# Altium PCB fligt_control_card.PcbDoc (part 3 of 3)
Units mil, origin at the board's own origin, x right, y up, seen from the top; angles counter-clockwise.
Board outline 2510.03 x 2930.03 mil, 4 copper layers (Top Layer, LY_1, LY_2, Bottom Layer), stack 62.677 mil thick; 107 components, 79 nets, 361 pads, 454 vias.
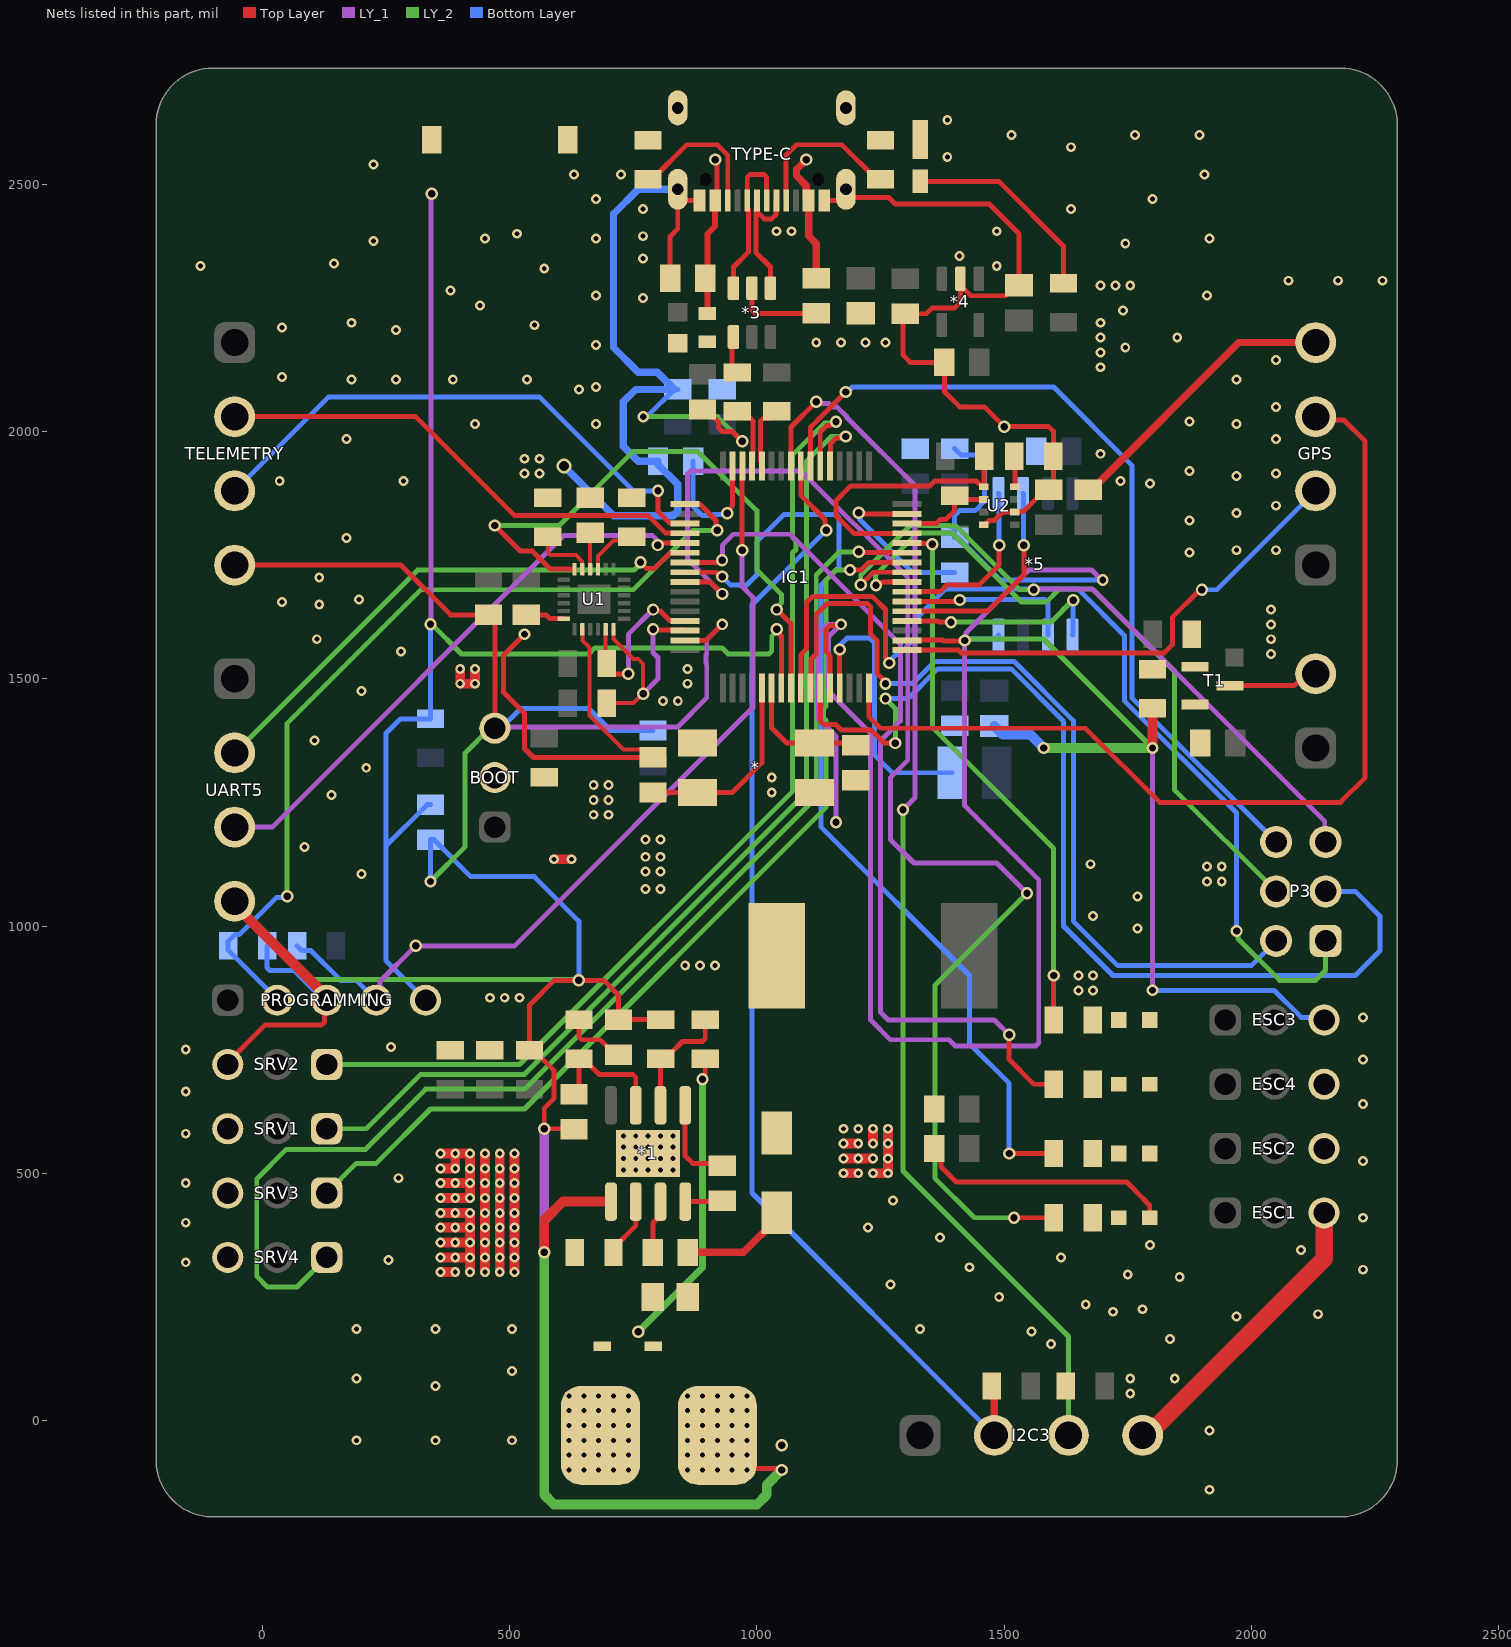
[diagram p4: the nets of this part, all layers, seen from the top]

## Via types
v1: diameter 20, hole 10, Top Layer to Bottom Layer, tented both sides, 351 vias
v2: diameter 25, hole 15, Top Layer to Bottom Layer, tented both sides, 89 vias
v3: diameter 23.62, hole 13.78, Top Layer to Bottom Layer, tented both sides, 8 vias
v4: diameter 35, hole 25, Top Layer to Bottom Layer, tented both sides, 4 vias
v5: diameter 25, hole 15, Top Layer to LY_2, tented both sides, 1 vias
v6: diameter 30, hole 20, Top Layer to Bottom Layer, tented both sides, 1 vias

## Nets (pads, with @x,y where several pads share a name; then routed paths per layer and width w, separated by ;. In a path a pad name is that pad's centre, name@x,y a point inside that pad or via, vN(x,y) a via of type N, cw(c..) or ccw(c..) an arc to the next point about the centre after c; other vN are vias at no path point) (continued)
GND: "PWR LED.1" "VIN(5V-24V) ->.2" *1.5 *1.9 *3.2 *4.2 *5.4 *.2 *.4 BOOT.3 C2.2 C3.2 C4.1 C5.1 C6.1 C7.2 C8.1 C9.1 C10.2 C11.1 C12.1 C13.1 C14.1 C15.1 C16.1 C17.1 C18.1 C19.1 C20.1 C21.1 C22.1 C23.1 C24.1 C25.1 C26.1 C27.1 C28.1 C29.1 C30.1 C31.1 C32.1 C33.1 D1.2 D3.1 D5.2 D6.1 D8.1 ESC1.3 ESC2.3 ESC3.3 ESC4.3 GPS.4 I2C3.4 IC1.12 IC1.18 IC1.63 PROGRAMMING.3 R1.1 R5.1 R6.1 R8.1 R9.1 R15.1 R17.1 R23.1 R26.1 R29.1 RESET.2 SRV1.3 SRV2.3 SRV3.3 SRV4.3 T1.2 TELEMETRY.4 TYPE-C.A1/B12 TYPE-C.A12/B1 TYPE-C.Shell U1.18 U1.20 U2.1 U2.7 UART5.4 | length 20885.8
  Top Layer w8: U1.20@647.01,1600 647.01,1577.13 661.15,1562.99 661.15,1425.53 730.15,1356.54 774.33,1356.54 C25.1@790,1340.87
  Top Layer w10: SRV2.3@-70,720 -70,724.14 5.86,800 120,800 125.86,805.86 125.86,845.86 PROGRAMMING.3@130,850 PROGRAMMING.3@130,856.93 ; UART5.4@-56.14,1043.07 UART5.4@-56.14,1050 ; TELEMETRY.4@-56.14,1730 280,1730 380.67,1629.33 C29.1@457.01,1629.33 470,1616.34 BOOT.3@470,1400 ; v3(530,1590) 487.5,1547.5 487.5,1472.5 530,1430 530,1358.97 548.1,1340.87 C25.1@790,1340.87 ; C30.1@533.38,1629.33 573.58,1629.33 581.45,1621.46 U1.18@609.8,1621.46 ; C6.1@630,589.13 629.13,590 v2(570,590) 570,631.84 590,651.84 590,707.6 548.86,748.74 R1.1@540,748.74 540,840 590,890 690,890 720,860 C9.1@720,810.63 R8.1@805.59,810.63 ; C2.2@824.57,2310 824.57,2363.14 824.14,2363.56 824.14,2394.14 839.92,2409.92 TYPE-C.Shell@839.92,2481.01 ; TYPE-C.Shell@839.92,2489.88 TYPE-C.Shell@839.92,2481.01 ; IC1.63@854.49,1577.64 897.64,1577.64 v3(930,1610) ; TYPE-C.A12/B1@884.01,2467.44 853.49,2467.44 TYPE-C.Shell@839.92,2481.01 ; C10.2@890,2044.57 896.89,2044.57 922.44,2019.02 922.44,2007.56 930,2000 950,2000 v2(970,1980) ; 920,-30 987.39,-97.39 1047.39,-97.39 v2(1050,-100) ; *3.2@990,2280 990,2244.99 995.86,2239.13 C3.2@1120,2239.13 ; D1.2@1040,407.2 D1.2@1040,420 ; TYPE-C.A1/B12@1135.98,2467.44 TYPE-C.Shell@1166.51,2467.44 ; IC1.12@1147.79,1481.18 1147.79,1546.87 1140,1554.66 1140,1600 1147.39,1607.39 1167.39,1607.39 v3(1170,1610) ; TYPE-C.Shell@1180.08,2489.88 1180.08,2486.8 1193.64,2473.23 1266.77,2473.23 1280,2460 1470,2460 1530,2400 C12.1@1530,2295.43 1524.09,2295.43 1503.27,2274.61 1432.32,2274.61 *4.2@1411.49,2295.43 ; IC1.18@1303.31,1577.64 1304.21,1578.54 1375.11,1578.54 1376.97,1576.69 1419.25,1576.69 v2(1420,1577.44) ; C5.1@1358.9,550 1372.36,536.54 1372.36,513.5 1403.46,482.4 1747.6,482.4 1783.46,446.54 1783.46,445.86 1794.45,434.87 D8.1@1794.45,410 ; *4.2@1411.49,2309.02 *4.2@1411.49,2295.43 ; U2.1@1458.5,1811.61 1460.39,1813.5 1463.34,1813.5 1469.84,1820 1480,1820 1497.2,1837.2 U2.7@1521.49,1837.2 1522.3,1838.01 1538.64,1838.01 1583.11,1882.48 C32.1@1590,1882.48 1599.37,1891.85 R26.1@1599.37,1950 1599.37,2000.63 1590,2010 v2(1500,2010) 1460,2050 1410,2050 1379.13,2080.87 C11.1@1379.13,2140 1310,2140 1295.67,2154.33 1295.67,2238.15 1342.56,2238.15 1354.41,2250 1360.59,2250 1360.71,2250.12 1400.12,2250.12 1411.49,2261.5 *4.2@1411.49,2295.43
  Top Layer w15: C7.2@860,340 972.79,340 D1.2@1040,407.2 ; C31.1@1670,1882.48 1676.89,1882.48 1974.41,2180 GPS.4@2130,2180
  Top Layer w20: UART5.4@-56.14,1043.07 PROGRAMMING.3@130,856.93 ; v1(360,300) v1(390,300) ; v1(360,330) v1(390,330) v1(420,330) ; v1(360,360) v1(390,360) v1(420,360) ; v1(360,390) v1(390,390) v1(420,390) ; v1(360,420) v1(390,420) v1(420,420) v1(420,390) ; v1(360,450) v1(390,450) v1(420,450) v1(420,480) ; v1(360,480) v1(390,480) v1(420,480) ; v1(360,510) v1(390,510) v1(390,540) ; v1(360,540) v1(390,540) ; v1(400,1520) v1(400,1490) v1(430,1490) v1(430,1520) ; v1(420,300) v1(420,330) ; v1(450,300) v1(450,330) v1(450,360) v1(450,390) v1(450,420) v1(450,450) v1(450,480) v1(450,510) v1(450,540) ; v1(480,300) v1(480,330) v1(480,360) v1(480,390) v1(480,420) v1(480,450) v1(480,480) v1(480,510) v1(480,540) ; v1(510,300) v1(510,330) v1(510,360) v1(510,390) v1(510,420) v1(510,450) v1(510,480) v1(510,510) v1(510,540) ; v2(570,340) 570,405 607.56,442.56 *1.5@705,442.56 ; v1(590,1135) v1(625,1135) ; v1(1175,500) v1(1205,500) ; v1(1175,530) v1(1205,530) v1(1235,530) ; v1(1175,560) v1(1205,560) ; v1(1235,500) v1(1265,500) v1(1265,530) v1(1265,560) v1(1265,590) ; v1(1235,560) v1(1235,590) ; v2(1800,1360) R15.1@1800,1440.63 ; v1(390,540) v1(420,540) v1(420,510) v1(420,480) ; v1(420,330) v1(420,360) ; v1(420,360) v1(420,390)
  Top Layer w35: I2C3.4@1780,-30 1790,-30 2147.05,327.05 ESC1.3@2147.05,420
  LY_1 w10: BOOT.3@470,1400 472.5,1402.5 839.67,1402.5 898.59,1461.41 898.59,1529.59 897.5,1530.68 897.5,1549.32 898.59,1550.41 898.59,1578.59 v3(930,1610) ; v2(1160,1210) 1160,1383.62 1123.19,1420.43 1123.19,1590 1143.19,1610 v3(1170,1610) 1144.84,1584.85 1144.84,1474.53 1230,1389.38 1230,810 1270,770 1388.41,770 1400.91,757.5 1564.14,757.5 1570,763.36 1570,1093.37 1420,1243.37 v2(1420,1577.44) 1422.87,1580.31 1422.87,1592.87 1550,1720 1676.91,1720 1697.33,1699.58 v3(1699.58,1699.58) ; v3(1800,870) v2(1800,1360)
  LY_1 w20: v2(570,340) v2(570,590)
  LY_2 w10: UART5.4@-56.14,1050 102.36,891.5 638.5,891.5 v2(640,890) ; v2(340,1090) 410,1160 410,1350 460,1400 BOOT.3@470,1400 ; v3(770,2030) 920,2030 v2(970,1980) ; v2(1420,1577.44) 1422.87,1580.31 1433.21,1580.31 1433.36,1580.45 1579.55,1580.45 v2(1800,1360)
  LY_2 w20: v2(570,340) 570,-150 590,-170 1000,-170 1020,-150 1020,-130.1 1050,-100.1 v2(1050,-100) ; v1(730,506.55) v1(755,506.55) ; v1(730,529.91) v1(755,529.91) ; v1(730,552.83) v1(730,575) ; v1(755,552.83) v1(755,575) ; v1(780,506.55) v1(780,529.91) ; v1(780,552.83) v1(780,575) ; v1(805,552.83) v1(805,575) ; v2(1580,1360) v2(1800,1360)
  Bottom Layer w10: R17.1@9.37,960 9.37,915.86 15.23,910 64.24,910 124.24,850 PROGRAMMING.3@130,850 ; v2(340,1090) C23.1@340,1174.57 346.89,1174.57 421.45,1100 550,1100 640,1010 v2(640,890) ; BOOT.3@470,1400 482.35,1400 522.35,1440 660,1440 704.57,1395.43 C17.1@790,1395.43 ; v3(770,2030) 772.6,2032.61 780.28,2032.61 832.68,2085 833.11,2085.43 C21.1@840,2085.43 ; C19.1@1400,1965.43 1413.17,1952.26 1447.73,1952.26 1460,1940 1460,1858.79 1441.21,1840 1410,1840 1400,1830 C27.1@1400,1785.43 1406.89,1785.43 1492.32,1700 1699.15,1700 v3(1699.58,1699.58) ; v2(1420,1577.44) 1422.56,1580 1481.34,1580 1488.34,1587.01 *5.4@1488.34,1588.39 ; v3(1800,870) 2045.73,870 2100.55,815.18 2141.87,815.18 ESC3.3@2147.05,810
  Bottom Layer w15: v6(610,1930) 710,1830 831.21,1830 840,1838.79 840,1893.11 800,1933.11 C26.1@800,1940 760,1940 730,1970 730,2060 755,2085 C21.1@832.68,2085 ; C21.1@833.11,2085.43 798.54,2120 760,2120 710,2170 710,2440 759.88,2489.88 TYPE-C.Shell@839.92,2489.88
  Bottom Layer w20: v1(805,506.55) v1(830,506.55) ; v1(805,529.91) v1(830,529.91) ; v1(830,552.83) v1(830,575) ; C22.1@1480,1404.57 1497.64,1386.93 1553.07,1386.93 v2(1580,1360)
  other v1: 1915,-140 860,-100 890,-100 920,-100 950,-100 980,-100 860,-70 890,-70 920,-70 950,-70 980,-70 190,-40 350,-40 505,-40 860,-40 890,-40 920,-40 950,-40 980,-40 1915,-20 860,-10 890,-10 920,-10 950,-10 980,-10 860,20 890,20 920,20 950,20 980,20 860,50 890,50 920,50 950,50 980,50 1755,55 350,70 190,85 1755,85 1845,85 505,100 1595,155 1835,165 1555,180 190,185 350,185 505,185 1330,185 1970,210 2135,215 1720,220 1780,225 1665,235 1490,250 1270,275 1855,290 1750,295 2225.35,305 1430,310 -155,320 255,325 1615,330 2100,345 1795,355 1370,370 1225,390 -155,400 2225.35,410 1275,445 -155,480 275,490 2225.35,525 -155,580 1175,590 1205,590 2225.35,640 -155,665 2225.35,730 -155,750 260,755 2225.35,815 460,855 490,855 520,855 1650,870 1680,870 1650,900 1680,900 855,920 885,920 915,920 1770,995 1680,1020 1770,1060 775,1075 805,1075 1910,1090 1940,1090 200,1105 775,1110 805,1110 1910,1120 1940,1120 1675,1125 775,1140 805,1140 85,1160 775,1175 805,1175 670,1225 700,1225 670,1255 700,1255 140,1265 1030,1270 670,1285 700,1285 1030,1300 210,1320 105,1375 810,1455 840,1455 200,1475 860,1490 860,1520 2040,1550 280,1555 110,1580 2040,1580 2040,1610 2040,1640 115,1650 40,1655 195,1660 115,1705 1875,1755 1970,1760 2050,1760 170,1785 1875,1820 1970,1835 2050,1850 1795,1895 35,1900 285,1900 1735,1900 1970,1910 530,1915 560,1915 2050,1915 1875,1920 530,1945 560,1945 1695,1955 170,1985 2050,1985 430,2015 675,2015 1970,2015 1875,2020 2050,2050 640,2085 675,2090 180,2105 270,2105 385,2105 535,2105 1970,2105 40,2110 1695,2130 2050,2145 1695,2160 1745,2170 675,2175 1120,2180 1170,2180 1220,2180 1260,2180 1695,2190 1850,2190 270,2205 40,2210 550,2215 180,2220 1695,2220 1740,2245 440,2255 770,2270 675,2275 1910,2275 380,2285 1695,2295 1725,2295 1755,2295 2075,2305 2175,2305 2265,2305 570,2330 -125,2335 1485,2335 145,2340 770,2350 1410,2355 1745,2380 225,2385 450,2390 675,2390 1915,2390 770,2395 515,2400 1040,2405 1070,2405 1485,2405 770,2450 1635,2450 675,2470 1800,2470 630,2520 725,2520 1905,2520 225,2540 1385,2555 1635,2575 1515,2600 1765,2600 1895,2600 1385,2630
  other v2: 1050,-50
LED_BLUE: IC1.56 R21.1 | length 1971.4
  Top Layer w10: IC1.56@854.49,1715.43 917.17,1715.43 925.88,1706.72 v2(929.57,1706.72) ; v2(1510,540) R21.1@1600,540
  Bottom Layer w10: v2(929.57,1706.72) 946.29,1690 980,1690 1000,1710 1000,1777.22 1054.59,1831.81 1160.52,1831.81 1166.38,1825.95 1166.38,1726.38 1130,1690 1130,1200 1430,900 1430,761.84 1510,681.84 v2(1510,540)
LED_GREEN: IC1.55 R20.1 | length 1769.1
  Top Layer w10: IC1.55@854.49,1735.12 921.43,1735.12 926.02,1739.7 v2(929.51,1739.7) ; v2(1510,780) 1510,730 1560,680 R20.1@1600,680
  LY_1 w10: v2(929.51,1739.7) 930,1740.19 930,1770 952.29,1792.29 1067.71,1792.29 1290,1570 1290,1415 1250,1375 1250,825.86 1265.86,810 1480,810 v2(1510,780)
LED_RED: IC1.28 R19.1 | length 1116.1
  Top Layer w10: IC1.28@1303.31,1774.49 1304.21,1773.58 1353.23,1773.58 v2(1354.94,1771.87) ; R19.1@1600,810 v2(1600,900)
  LY_2 w10: v2(1354.94,1771.87) 1354.94,1401.75 1600,1156.69 v2(1600,900)
LED_YELLOW: IC1.57 R22.1 | length 2686.1
  Top Layer w10: IC1.57@854.49,1695.75 906,1695.75 v2(930.22,1671.53) ; v2(1520,410) R22.1@1600,410
  LY_1 w10: v2(930.22,1671.53) 860,1741.75 860,1914.14 865.86,1920 1090,1920 1305,1705 1305,1335 1270,1300 1270,1175.07 1317.67,1127.4 1484.88,1127.4 v2(1546.24,1066.04)
  LY_2 w10: v2(1520,410) 1440,410 1360,490 1360,879.8 v2(1546.24,1066.04)
Net*1_2: *1.2 R4.1 R8.2 | length 239.8
  Top Layer w10: *1.2@805,637.44 805,731.3 R8.2@805.59,731.89 819.29,745.59 828.68,745.59 849.54,766.45 889.73,766.45 895.59,772.31 R4.1@895.59,810.63
Net*1_3: *1.3 C6.2 R7.2 | length 263.4
  Top Layer w10: C6.2@630,660 640,670 R7.2@640,731.89 648.86,731.89 680.75,700 749.14,700 755,694.14 *1.3@755,637.44
Net*1_6: *1.6 R9.2 | length 121.2
  Top Layer w10: R9.2@710,340 710,348.86 755,393.86 *1.6@755,442.56
Net*1_7: *1.7 C7.1 C8.2 D2.1 R4.2 | length 718
  Top Layer w10: C7.1@789.13,340 790,340.87 790,400 805,415 *1.7@805,442.56 ; v2(890,690) 890,693.69 895.59,699.28 R4.2@895.59,731.89
  LY_2 w14: v2(760,179.17) 890,309.17 v2(890,690)
Net*1_8: *1.8 C1.1 | length 75.8
  Top Layer w10: *1.8@855,442.56 927.99,442.56 C1.1@930,444.57
Net*3_4: *3.4 R11.1 | length 76.2
  Top Layer w10: *3.4@949.33,2187.52 949.33,2130.04 R11.1@960,2119.37 ; R11.1@970,2119.37 R11.1@972.6,2121.97
Net*5_1: *5.1 IC1.20 | length 427.8
  Top Layer w10: IC1.20@1303.31,1617.01 1365.59,1617.01 1367.96,1614.64 1392.05,1614.64 v2(1392.5,1614.19)
  LY_2 w10: v2(1392.5,1614.19) 1392.95,1614.64 1594.64,1614.64 1639.17,1659.17 v2(1639.86,1659.17)
  Bottom Layer w10: *5.1@1638.34,1588.39 1639.17,1589.21 1639.17,1658.48 v2(1639.86,1659.17)
Net*5_2: *5.2 IC1.22 | length 354.7
  Top Layer w10: IC1.22@1303.31,1656.38 1396.64,1656.38 1396.7,1656.44 1407.13,1656.44 v2(1410,1659.31)
  Bottom Layer w10: v2(1410,1659.31) 1410.69,1660 1582.49,1660 1588.34,1654.14 *5.2@1588.34,1588.39
Net*5_5: *5.5 IC1.23 | length 354.7
  Top Layer w10: IC1.23@1303.31,1676.06 1370.56,1676.06 1384.5,1690 1450,1690 1490,1730 v2(1490,1769.86)
  Bottom Layer w10: *5.5@1488.34,1875 1489.17,1874.17 1489.17,1770.69 v2(1490,1769.86)
Net*5_6: *5.6 IC1.21 | length 432.7
  Top Layer w10: IC1.21@1303.31,1636.69 1466.69,1636.69 1540,1710 v2(1540,1770)
  Bottom Layer w10: *5.6@1538.34,1875 1539.17,1874.17 1539.17,1770.83 v2(1540,1770)
NetC9_2: C9.2 R7.1 | length 129.7
  Top Layer w10: R7.1@640,810.63 640,775.86 645.86,770 682.87,770 713.11,739.76 C9.2@720,739.76
NetC26_2: C26.2 IC1.47 | length 269.5
  Top Layer w10: v2(940,1835) 940,1839.06 950.94,1850 IC1.47@950.94,1930
  Bottom Layer w10: C26.2@870.86,1940 870.86,1849.13 890,1830 910.47,1830 912.6,1832.13 937.13,1832.13 v2(940,1835)
NetC27_2: C27.2 IC1.31 | length 349.7
  Top Layer w10: v2(1205.91,1835.91) 1208.27,1833.54 IC1.31@1303.31,1833.54
  Bottom Layer w10: v2(1205.91,1835.91) 1208.78,1833.04 1208.78,1821.22 1315.43,1714.57 C27.2@1400,1714.57
NetC28_2: C28.2 U1.10 | length 73.5
  Top Layer w8: U1.10@662.75,1721.65 C28.2@662.75,1795.12
NetD3_2: D3.2 R21.2
NetD4_2: "PWR LED.2" R12.1 | length 419.9
  Top Layer w10: 1330,2506 1488.99,2506 1620,2375 R12.1@1620,2299.37
NetD5_1: D5.1 R19.2
NetD6_2: D6.2 R20.2
NetD8_2: D8.2 R22.2
NetF1_2: F1.2 L2.1
NetJ1_A5: R6.2 TYPE-C.A5 | length 319.9
  Top Layer w10: TYPE-C.A5@1059.21,2467.44 1059.21,2559.21 1080,2580 1171.77,2580 1241.14,2510.63 R6.2@1250,2510.63
NetJ1_B5: R5.2 TYPE-C.B5 | length 290
  Top Layer w10: R5.2@780,2510.63 788.86,2510.63 858.23,2580 920,2580 941.09,2558.91 TYPE-C.B5@941.09,2467.45
NetL3_2: IC1.13 L3.2 | length 565.6
  Top Layer w10: v2(1167.34,1559.14) 1167.48,1559 IC1.13@1167.48,1481.18
  Bottom Layer w10: v2(1167.34,1559.14) 1170.21,1562.01 1170.21,1570.22 1182.5,1582.5 1227.5,1582.5 1237.5,1572.5 1237.5,1346.12 1273.62,1310 L3.2@1394.92,1310
NetP2_2: BUZZER.2 T1.3 | length 183.2
  Top Layer w10: T1.3@1956.66,1486.07 2086.4,1486.07 2110.33,1510 BUZZER.2@2130,1510
NetP8_2: BOOT.2 R18.1
NetP13_2: IC1.52 TELEMETRY.2 | length 1008.3
  Top Layer w10: TELEMETRY.2@-56.14,2030 310,2030 510,1830 780,1830 814.92,1795.08 853.58,1795.08 IC1.52@854.49,1794.17
NetP13_3: IC1.51 TELEMETRY.3 | length 1119.8
  Top Layer w10: v2(800,1880) 800,1838.46 823.69,1814.76 853.58,1814.76 IC1.51@854.49,1813.86
  Bottom Layer w10: TELEMETRY.3@-56.14,1880 133.86,2070 560,2070 750,1880 v2(800,1880)
NetP14_2: GPS.2 IC1.17 | length 997
  Top Layer w10: IC1.17@1303.31,1557.95 1407.66,1557.95 1413.17,1552.44 1823.47,1552.44 1840,1568.97 1840,1624.14 1892.99,1677.13 1897.13,1677.13 v2(1900,1680)
  Bottom Layer w10: v2(1900,1680) 1930,1680 GPS.2@2130,1880
NetP14_3: GPS.3 IC1.16 | length 1954.5
  Top Layer w10: IC1.16@1226.53,1481.18 1226.53,1423.46 1250,1400 1664.33,1400 1814.33,1250 2180,1250 2230,1300 2230,1980 2186.34,2023.66 2136.34,2023.66 GPS.3@2130,2030
NetP15_2: IC1.54 UART5.2 | length 1090.5
  Top Layer w10: v2(764.58,1735.42) 777.39,1722.61 792.4,1722.61 823.69,1753.9 853.58,1753.9 IC1.54@854.49,1754.8
  LY_2 w10: UART5.2@-56.14,1350 313.86,1720 751.91,1720 764.58,1732.67 v2(764.58,1735.42)
NetP15_3: IC1.53 UART5.3 | length 1169.8
  Top Layer w10: v2(799.58,1770.42) 803.26,1770.42 807.33,1774.49 IC1.53@854.49,1774.49
  LY_1 w10: UART5.3@-56.14,1200 20,1200 610,1790 732.58,1790 788.55,1790 796.71,1781.84 796.71,1773.29 v2(799.58,1770.42)
NetP16_2: I2C3.2 IC1.40 R31.1 | length 2348.7
  Top Layer w10: IC1.40@1088.74,1930 1088.74,1871.26 1137.81,1822.18 1137.81,1803.03 v2(1140.42,1800.42) ; R31.1@1475,70 R31.1@1480,65
  Top Layer w15: I2C3.2@1480,-30 R31.1@1480,65
  Bottom Layer w10: v2(1140.42,1800.42) 990,1650 990,460 I2C3.2@1480,-30
NetP16_3: I2C3.3 IC1.41 R30.1 | length 2491.4
  Top Layer w10: IC1.41@1069.05,1930 1069.05,2009.06 v2(1120,2060)
  LY_1 w10: v2(1120,2060) 1122.87,2057.13 1145.37,2057.13 1152.5,2050 1161.82,2050 1182.5,2029.32 1182.5,2027.5 1320,1890 1320,1260 v2(1295.39,1235.39)
  LY_2 w10: v2(1295.39,1235.39) 1295.39,504.61 1630,170 I2C3.3@1630,-30
NetR2_2: R2.2 R3.1
NetR10_2: IC1.44 R10.2 | length 121.7
  Top Layer w10: IC1.44@1007.5,1940 1007.5,2021.07 1013.36,2026.93 1026.3,2026.93 R10.2@1040,2040.63
NetR11_2: IC1.45 R11.2 | length 121.7
  Top Layer w10: R11.2@960,2040.63 973.7,2026.93 986.64,2026.93 992.5,2021.07 IC1.45@992.5,1940
NetR14_2: R14.2 R15.2 T1.1
NetR23_2: R23.2 U1.11 | length 124.5
  Top Layer w8: R23.2@577.01,1787.24 577.01,1755.86 582.86,1750 634.01,1750 646.68,1737.34 646.68,1721.98 U1.11@647.01,1721.65
NetR24_1: IC1.30 R24.1 U2.3 | length 199
  Top Layer w10: IC1.30@1303.31,1813.86 1362.19,1813.86 1370.84,1822.5 1382.5,1822.5 1400,1840 R24.1@1400,1870 1407.2,1862.8 U2.3@1458.5,1862.8
NetR25_1: IC1.29 R25.1 U2.4 | length 570
  Top Layer w10: IC1.29@1303.31,1794.17 1195.82,1794.17 1160,1830 1160,1860 1190,1890 1350,1890 1360,1900 1443.94,1900 1455.55,1888.39 U2.4@1458.5,1888.39 1458.94,1888.82 1458.94,1949.57 R25.1@1459.37,1950
NetR26_2: R26.2 U2.5 | length 62
  Top Layer w10: R26.2@1520.63,1950 1521.49,1949.13 U2.5@1521.49,1888.39
NetR27_2: IC1.62 R27.2 U1.24 | length 454.5
  Top Layer w8: R27.2@696.38,1450.71 750.71,1450.71 v2(770,1470) 770,1530 760,1540 750,1540 710,1580 U1.24@710,1600
  Top Layer w10: v2(790,1600) 791.77,1598.23 853.58,1598.23 IC1.62@854.49,1597.32
  LY_1 w10: v2(770,1470) 800,1500 800,1542.97 790,1552.97 v2(790,1600)
NetR28_2: IC1.61 R28.2 U1.23 | length 351.2
  Top Layer w8: R28.2@694.25,1532.83 U1.23@694.25,1600
  Top Layer w10: R28.2@694.25,1532.83 R28.2@696.38,1530.71 696.38,1523.7 710.08,1510 v2(740,1510) ; v2(790,1640) 792.87,1637.13 804.47,1637.13 823.69,1617.91 853.58,1617.91 IC1.61@854.49,1617.01
  LY_1 w10: v2(740,1510) 740,1590 v2(790,1640)
NetR29_2: R29.2 U1.9 | length 111.4
  Top Layer w8: U1.9@678.5,1721.65 678.5,1748.5 689.4,1759.41 710,1779.99 739.75,1779.99 R29.2@747.01,1787.24
NetU1_12: IC1.8 U1.12 | length 1235.4
  Top Layer w10: v2(470,1810) 521.45,1758.54 545.6,1758.54 582.49,1721.65 U1.12@631.26,1721.65 ; v2(1040,1640) 1069.05,1610.94 IC1.8@1069.05,1481.18
  LY_2 w10: v2(470,1810) 600,1810 750,1960 880,1960 1000,1840 1000,1720 1050,1670 1050,1654.06 1040,1644.06 v2(1040,1640)
NRST: C23.2 IC1.7 PROGRAMMING.5 R13.1 RESET.1 | length 2759.2
  Top Layer w10: v2(1040,1600) 1040,1595.94 1049.37,1586.57 IC1.7@1049.37,1481.18
  LY_1 w10: v2(340,1610) 341.1,1611.11 341.1,2479.74 v2(342.21,2480.84)
  LY_2 w10: v2(340,1610) 342.67,1610 402.67,1550 659.74,1550 672.24,1562.5 929.32,1562.5 941.82,1550 1024.2,1550 1030.06,1555.86 1030.06,1586 1040,1595.94 v2(1040,1600)
  Bottom Layer w10: 250,930 250,1162.32 333.11,1245.43 C23.2@340,1245.43 ; 250,1163.32 250,1390 278.74,1418.74 R13.1@340,1418.74 v2(340,1610) ; 250.71,929.29 PROGRAMMING.5@330,850
OSC_IN: *.3 C25.2 IC1.5 | length 396
  Top Layer w10: C25.2@790,1270 *.3@880,1270 950,1270 1010,1330 IC1.5@1010,1481.18
OSC_OUT: *.1 C24.2 IC1.6 | length 265.6
  Top Layer w10: IC1.6@1029.68,1481.18 1029.68,1400.32 1060,1370 *.1@1116.22,1370 1195.43,1370 C24.2@1200,1365.43
PC_1: IC1.9 P3.1 | length 2055.3
  Top Layer w10: IC1.9@1088.74,1481.18 1088.74,1548.74 1100,1560 1100,1654.14 1112.67,1666.81 1233.19,1666.81 1260,1640 1260,1543.43 1267.5,1535.93 v2(1267.5,1531.87)
  LY_2 w10: v2(1970,990) 1972.58,987.42 1972.58,974.67 2057.25,890 2130,890 2150,910 P3.1@2150,970
  Bottom Layer w10: v2(1267.5,1531.87) 1267.5,1535.53 1280.86,1548.89 1287.07,1548.89 1320,1581.81 1320,1620 1381.81,1681.81 1649.03,1681.81 1743.19,1587.66 1743.19,1455.6 1970,1228.79 v2(1970,990)
PC_2: IC1.10 P3.2 | length 1765
  Top Layer w10: IC1.10@1108.42,1481.18 1109.33,1482.09 1109.33,1539.33 1120,1550 1120,1630 1141.81,1651.81 1224.14,1651.81 1230,1645.95 1230,1590 1242.44,1577.56 1242.44,1511.33 1260,1493.77 v2(1260,1490)
  Bottom Layer w10: v2(1260,1490) 1314.64,1490 1359.64,1535 1520.35,1535 1640,1415.36 1640,1010 1730,920 2000,920 P3.2@2050,970
PC_3: IC1.11 P3.3 | length 2071.1
  Top Layer w10: IC1.11@1128.11,1481.18 1129.01,1480.28 1129.01,1413.42 1134.87,1407.56 1159.73,1407.56 1171.19,1396.1 1231.7,1396.1 1257.8,1370 v2@1270,1370
  LY_2 w10: v2(1260,1460) 1280,1440 v2(1280,1370)
  Bottom Layer w10: v2(1260,1460) 1305.86,1460 1365.86,1520 1514.14,1520 1620,1414.14 1620,1000 1720,900 2210,900 2260,950 2260,1020 2210,1070 P3.3@2150,1070
PC_4: IC1.24 P3.4 | length 1394.6
  Top Layer w10: v2(1240.81,1688.84) 1244.87,1688.84 1251.12,1695.09 1253.45,1695.09 1254.11,1695.75 IC1.24@1303.31,1695.75
  LY_2 w10: v2(1240.81,1688.84) 1240.1,1689.55 1240.1,1710.1 1324.37,1794.37 1395.63,1794.37 1535,1655 1585,1655 1611.81,1681.81 1678.19,1681.81 1844.26,1515.74 1844.26,1275.74 P3.4@2050,1070
PC_5: IC1.25 P3.5 | length 1395.3
  Top Layer w10: v2(1210,1690) 1235.43,1715.43 IC1.25@1303.31,1715.43
  LY_1 w10: v5(1560,1680) 1561.81,1681.81 1678.19,1681.81 2148.38,1211.62 2148.38,1171.62 P3.5@2150,1170
  LY_2 w10: v2(1210,1690) 1210,1710 1310,1810 1390,1810 1390.63,1809.37 1401.84,1809.37 1531.21,1680 v5(1560,1680)
PC_8: IC1.39 P3.6 | length 1710.2
  Top Layer w10: IC1.39@1108.42,1930 1108.42,1984.96 1108.38,1985.01 1108.38,2008.38 1121.12,2021.13 v2(1180,2080)
  Bottom Layer w10: v2(1180,2080) 1183.36,2080 1193.36,2090 1600,2090 1758.19,1931.81 1758.19,1461.81 P3.6@2050,1170
SERVO_PWM_1: IC1.37 SRV1.1 | length 2105.5
  Top Layer w10: IC1.37@1147.79,1930 1148.7,1930.91 1148.7,1975.34 1160.49,1987.13 1177.13,1987.13 v2(1180,1990)
  LY_2 w10: SRV1.1@130,590 210,590 320,700 530,700 1100,1270 1100,1940 1150,1990 v2(1180,1990)
SERVO_PWM_2: IC1.38 SRV2.1 | length 2082.3
  Top Layer w10: IC1.38@1128.11,1930 1128.11,1998.96 1140.96,2011.81 1147.75,2011.81 1155.94,2020 v2(1160,2020)
  LY_2 w10: SRV2.1@130,720 520,720 1071.81,1271.81 1071.81,1754.25 1079.01,1761.44 1079.01,1779.51 1071.81,1786.71 1071.81,1951.81 1137.13,2017.13 1157.13,2017.13 v2(1160,2020)
SERVO_PWM_3: IC1.26 SRV3.1 | length 1975.1
  Top Layer w10: v2(1188.19,1720) 1211.07,1720 1226.19,1735.12 IC1.26@1303.31,1735.12
  LY_2 w10: SRV3.1@130,460 190,520 230,520 340,630 530,630 1140,1240 1140,1415.74 1135,1420.74 1135,1439.38 1140,1444.38 1140,1700 1160,1720 v2(1188.19,1720)
SERVO_PWM_4: IC1.27 SRV4.1 | length 2477
  Top Layer w10: v2(1206.11,1756.96) 1207.53,1755.54 1302.57,1755.54 IC1.27@1303.31,1754.8
  LY_2 w10: SRV4.1@130,330 70,270 10,270 -11.5,291.5 -11.5,488.5 48.5,548.5 208.5,548.5 330,670 530,670 1120,1260 1120,1710 1166.27,1756.27 1205.42,1756.27 v2(1206.11,1756.96)
SW: *1.1 C1.2 D1.1 L1.1 | length 185.5
  Top Layer w10: *1.1@855,637.44 855,535 870,520 925.43,520 C1.2@930,515.43
SWCLK: IC1.49 PROGRAMMING.2 R17.2 | length 1796.6
  Top Layer w10: IC1.49@854.49,1853.23 855.39,1852.32 885.28,1852.32 917.39,1820.21 917.39,1802.61 v2(920,1800)
  LY_2 w10: v2(50,1060) 50,1410 320,1680 750,1680 870,1800 v2(920,1800)
  Bottom Layer w10: PROGRAMMING.2@30,850 30,851.77 -69.37,951.14 R17.2@-69.37,960 -69.37,968.86 -55.67,982.56 -46.81,982.56 28.02,1057.39 47.39,1057.39 v2(50,1060)
SWDIO: IC1.46 PROGRAMMING.4 R16.2 | length 1726.7
  Top Layer w10: v2(970,1760) IC1.46@970,1929.37
  LY_1 w10: PROGRAMMING.4@230,850 237.88,857.88 237.88,887.88 v2(310,960) 510,960 991.81,1441.81 991.81,1665.13 970,1686.94 v2(970,1760)
  Bottom Layer w10: R16.2@70,960 79.5,950.5 97.84,950.5 158.34,890 190,890 PROGRAMMING.4@230,850
USB_DN: *3.1 TYPE-C.A7 TYPE-C.B7 | length 270.9
  Top Layer w10: TYPE-C.A7@997.81,2448.56 997.81,2362.19 1027.4,2332.6 *3.1@1027.4,2290 ; TYPE-C.A7@1000.16,2467.44 1001.06,2466.54 1001.06,2443.73 1014.79,2430 1030,2430 1038.62,2438.62 1038.62,2466.54 TYPE-C.B7@1039.53,2467.44
USB_DP: *3.3 TYPE-C.A6 TYPE-C.B6 | length 328.9
  Top Layer w10: *3.3@952.6,2290 952.6,2332.63 982.81,2362.85 982.81,2448.56 980.47,2450.91 TYPE-C.B6@980.47,2467.44 980.47,2514.3 986.33,2520.16 1013.98,2520.16 1019.84,2514.3 TYPE-C.A6@1019.84,2467.44
VBUS: C2.1 C3.1 F1.1 TYPE-C.A4/B9 TYPE-C.A9/B4 | length 589.4
  Top Layer w10: TYPE-C.A9/B4@915.51,2467.44 919.01,2470.94 919.01,2542.91 915.61,2546.31 v2(915.61,2550)
  Top Layer w12: F1.1@900,2238.54 900,2305.43 C2.1@895.43,2310 900,2314.57 900,2400 915.51,2415.51 TYPE-C.A9/B4@915.51,2467.44
  Top Layer w15: v2(1100,2550) 1080,2530 1080,2517.56 1100.18,2497.38 1100.18,2471.75 TYPE-C.A4/B9@1104.49,2467.44 1104.49,2395.51 1120,2380 C3.1@1120,2310
VCC: "VIN(5V-24V) ->.1" D2.2
  other v1: 620,-100 650,-100 680,-100 710,-100 740,-100 620,-70 650,-70 680,-70 710,-70 740,-70 620,-40 650,-40 680,-40 710,-40 740,-40 620,-10 650,-10 680,-10 710,-10 740,-10 620,20 650,20 680,20 710,20 740,20 620,50 650,50 680,50 710,50 740,50
pads on no net: *4.4 IC1.2 IC1.3 IC1.4 IC1.33 IC1.34 IC1.35 IC1.36 IC1.50 IC1.59 T1.4 TYPE-C.A8 TYPE-C.B8 TYPE-C.MH1 TYPE-C.MH2 U1.2 U1.3 U1.4 U1.5 U1.6 U1.7 U1.14 U1.15 U1.16 U1.17 U1.19 U1.21 U1.22 U1.25

## Polygon pours and split planes (outlines as drawn)
GND on Bottom Layer "GND_L04_P006" (solid, remove dead copper, pour order 6): -112.53,-194.33 -110,-195.01 2190,-195.01 2192.53,-194.33 ccw(c2180,-80) 2294.33,-92.53 2295.01,-90 2295.01,2620 ccw(c2180,2620) 2180,2735.01 -100,2735.02 ccw(c-100,2620) -215.02,2620 -214.33,-92.53 ccw(c-100,-80)
GND on LY_2 "GND_L03_P005" (solid, remove dead copper, pour order 5): -112.53,-194.33 -110,-195.01 2190,-195.01 2192.53,-194.33 ccw(c2180,-80) 2294.33,-92.53 2295.01,-90 2295.01,2620 ccw(c2180,2620) 2180,2735.01 -100,2735.02 ccw(c-100,2620) -215.02,2620 -214.33,-92.53 ccw(c-100,-80)
GND on Top Layer "GND_L01_P003" (solid, remove dead copper, pour order 3): -112.53,-194.33 -110,-195.01 2190,-195.01 2192.53,-194.33 ccw(c2180,-80) 2294.33,-92.53 2295.01,-90 2295.01,2620 ccw(c2180,2620) 2180,2735.01 -100,2735.02 ccw(c-100,2620) -215.02,2620 -214.33,-92.53 ccw(c-100,-80)
GND on LY_1 "LY1_GND_POLYGON" (solid, remove dead copper, pour order 0): -112.53,-194.33 -110,-195.01 2190,-195.01 2192.53,-194.33 ccw(c2180,-80) 2294.33,-92.53 2295.01,-90 2295.01,2620 ccw(c2180,2620) 2180,2735.01 -100,2735.02 ccw(c-100,2620) -215.02,2620 -214.33,-92.53 ccw(c-100,-80)

## Keep-outs
Keep-Out Layer:
  lines w10: -210,-90 -210,2620 cw(c-100,2620) -100,2730 1290,2730 2180,2730 cw(c2180,2620) 2290,2620 2290,-90 ; -210,-80 ccw(c-100,-80) -100,-190 ; -110,-190 2190,-190 ; 2180,-190 ccw(c2180,-80) 2290,-80 ; -215.02,2620 cw(c-100,2620) -100,2735.01 2180,2735.02 cw(c2180,2620) 2295.01,2620 2295.01,-90 2294.33,-92.53 cw(c2180,-80) 2192.53,-194.33 2190,-195.01 -110,-195.01 -112.53,-194.33 cw(c-100,-80) -214.33,-92.53 -215.02,2620

## Other copper
Top Layer:
  region net GND: 830,-120 850,-140 1050,-140 1070,-120 1070,80 1070,310 1130,370 1130,470 1110,490 1020,490 1000,470 1000,400 980,380 970,380 840,380 830,370
  region net GND: 780,1850 770,1840 540,1840 520,1860 520,1920 550,1950 750,1950 780,1920
  region net GND: 1930,1460 1910,1480 1760,1480 1750,1470 1750,1420 1760,1410 1850,1410 1870,1390 1870,1340 1880,1330 1920,1330 1930,1340
  region net +5V_DC: 1940,1410 1940,1310 1950,1300 2170,1300 2180,1310 2180,1410 2170,1420 1950,1420 1940,1410 1950,1420
  region net +5V_DC: 1170,2360 1170,2290 1180,2280 1380,2280 1390,2290 1390,2360 1380,2370 1180,2370
  region net NRST: 300,2630 290,2620 290,2480 310,2460 370,2460 390,2480 390,2620 380,2630
  region net GND: 1330,670 1320,660 1320,510 1330,500 1380,500 1390,510 1390,660 1380,670
  region net GND: 1170,1330 1150,1310 1070,1310 1060,1300 1060,1210 1080,1190 1210,1190 1240,1210 1240,1280 1240,1320 1230,1330
  region net GND: 810,1310 760,1310 750,1320 750,1360 760,1370 820,1370 830,1380 830,1400 840,1410 920,1410 930,1400 930,1340 920,1330 840,1330 830,1320 840,1330 830,1330
  region net +5V_DC: 1360,1070 1340,1050 1350,1040 1340,1050 1340,820 1400,760 1400,510 1410,500 1460,500 1480,520 1480,810 1500,830 1500,1050 1480,1070
  region net NetR2_2: 490,780 340,780 330,770 330,720 340,710 490,710 500,720 500,770
  region net GND: 1090,2270 1080,2260 1080,2210 1090,2200 1330,2200 1340,2210 1340,2260 1330,2270
  region net VCC: 710,180 660,180 650,170 650,120 580,50 580,-120 610,-150 760,-150 790,-120 790,50 720,120 720,175
  region net SW: 1100,1080 970,1080 950,1060 950,670 1000,620 1000,570 980,550 900,550 890,540 890,490 900,480 970,480 1000,510 1060,510 1110,560 1110,1070
  region net +3.3V_DC: 1440,2260 1420,2240 1420,2100 1430,2090 1480,2090 1490,2100 1490,2110 1650,2110 1660,2120 1660,2250 1650,2260
  region net GND: 1160,2700 1150,2690 1150,2620 1200,2570 1210,2570 1210,2610 1220,2620 1210,2630 1210,2690 1200,2700
  region net Net*1_7: 810,380 760,380 740,360 740,150 760,130 810,130 820,140 820,370
  region net NetP16_3: 1640,110 1600,110 1590,100 1590,10 1580,0 1580,-60 1600,-80 1660,-80 1680,-60 1680,0 1650,30 1650,100
  region net GND: 1820,890 1820,390 1810,380 1780,380 1770,390 1770,890
  region net +5V_DC: 2085,860 2010,860 2000,850 2000,390 2010,380 2080,380 2090,390 2090,850
  region net +5V_DC: 65,770 -10,770 -20,760 -20,300 -10,290 60,290 70,300 70,760
  region net GND: -34.4,770.24 -109.4,770.24 -119.4,760.24 -119.4,300.24 -109.4,290.24 -39.4,290.24 -29.4,300.24 -29.4,760.24
  region net +3.3V_DC: 650,1420 640,1410 570,1410 550,1430 550,1550 570,1570 640,1570 650,1560
  region net NetP8_2: 600,1330 500,1330 490,1340 440,1340 430,1330 430,1270 440,1260 490,1260 500,1270 600,1270 610,1280 610,1320
  region net NetD8_2: 1710,440 1700,450 1660,450 1650,440 1650,380 1660,370 1700,370 1720,390 1750,390 1760,400 1760,430 1750,440
  region net NetD3_2: 1710,570 1700,580 1660,580 1650,570 1650,510 1660,500 1700,500 1720,520 1750,520 1760,530 1760,560 1750,570
  region net NetD6_2: 1710,710 1700,720 1660,720 1650,710 1650,650 1660,640 1700,640 1720,660 1750,660 1760,670 1760,700 1750,710
  region net NetD5_1: 1710,840 1700,850 1660,850 1650,840 1650,780 1660,770 1700,770 1720,790 1750,790 1760,800 1760,830 1750,840
  region net GND: 2185,860 2110,860 2100,850 2100,390 2110,380 2180,380 2190,390 2190,850
  region net NetR14_2: 1890,1630 1860,1630 1850,1620 1850,1550 1840,1540 1770,1540 1760,1530 1760,1500 1770,1490 1830,1490 1850,1510 1920,1510 1930,1520 1930,1530 1920,1540 1910,1540 1900,1550 1900,1620
  region net GND: 440,1570 420.33,1589.67 420.33,1650.61 430.33,1660.61 560.33,1660.61 570.33,1650.61 570.33,1582.98 557.35,1570
  region net +3.3V_DC: 430,1670 420,1680 420,1720 430,1730 560,1730 570,1720 570,1680 560,1670
  region net NetF1_2: 820,2210 810,2200 810,2160 820,2150 880,2150 890,2160 920,2160 930,2170 930,2200 920,2210
  region net GND: 1560,1910 1550,1900 1550,1860 1560,1850 1710,1850 1720,1860 1720,1900 1710,1910
  region net +3.3V_DC: 1560,1840 1550,1830 1550,1790 1560,1780 1710,1780 1720,1790 1720,1830 1710,1840
  region net GND: 600,2630 590,2620 590,2560 600,2550 740,2550 750,2560 810,2560 830,2580 830,2600 850,2600 870,2620 870,2680 850,2700 830,2700 810,2680 810,2640 800,2630
  region net GND: 1220,2560 1210,2570 1210,2610 1220,2620 1290,2620 1310,2640 1350,2640 1360,2630 1360,2550 1350,2540 1300,2540 1290,2550 1280,2560
LY_2:
  region net VBUS: 910,2580 900,2570 900,2540 910,2530 1110,2530 1120,2540 1120,2570 1110,2580
  region net GND: 1210,2450 1200,2440 1160,2440 1150,2450 1150,2690 1160,2700 1200,2700 1210,2690 1210,2680
  region net GND: 870,2450 860,2440 820,2440 810,2450 810,2690 820,2700 860,2700 870,2690 870,2680
Bottom Layer:
  region net +3.3V_DC: 1660,1990 1610,1990 1610,1940 1570,1900 1560,1890 1560,1730 1570,1720 1660,1720 1670,1730 1670,1980
  region net +3.3V_DC: 1290,1920 1280,1910 1280,1860 1290,1850 1430,1850 1440,1860 1440,1910 1430,1920
  region net GND: 810,2610 800,2620 800,2705 810,2710 820,2710 1220,2710 1230,2700 1230,2620 1220,2610
  region net GND: 1520,1430 1380,1430 1370,1420 1370,1380 1380,1370 1520,1370 1530,1380 1530,1420
  region net +3.3V_DC: 1510,1510 1370,1510 1360,1500 1360,1450 1370,1440 1510,1440 1520,1450 1520,1500
  region net GND: 1590,1930 1600,1940 1600,2010 1580,2030 1300,2030 1280,2010 1280,1940 1290,1930
  region net GND: 960,2050 970,2060 970,2110 960,2120 810,2120 800,2110 800,2060 810,2050

## Silkscreen, mask and mechanical layers (free items; w line width, h text height)
Top Overlay:
  drawing of 526 lines, arcs and shapes, not listed
  text "FLIGHT CONTROL BOARD" at 161,2259 h40 r270
  text "PC8" at 1805.19,1123.67 h30
  text "PC5" at 1903.04,1123.67 h30
  text "PC4" at 1803.04,1078.67 h30
  text "PC3" at 1898.04,1078.67 h30
  text "PC2" at 1805.19,1028.67 h30
  text "PC1" at 1898.04,1028.67 h30
  text "ESC-5V-GND" at 1905,325 h30
  text "GND-5V-SRV" at -109.04,227.16 h30